# Altium PCB Mega2560_Custom.PcbDoc (part 5 of 6)
Units mil, origin at the board's own origin, x right, y up, seen from the top; angles counter-clockwise.
Board outline 4742.41 x 2889.95 mil, 2 copper layers (Top Layer, Bottom Layer), stack 57 mil thick; 213 components, 133 nets, 789 pads, 812 vias.
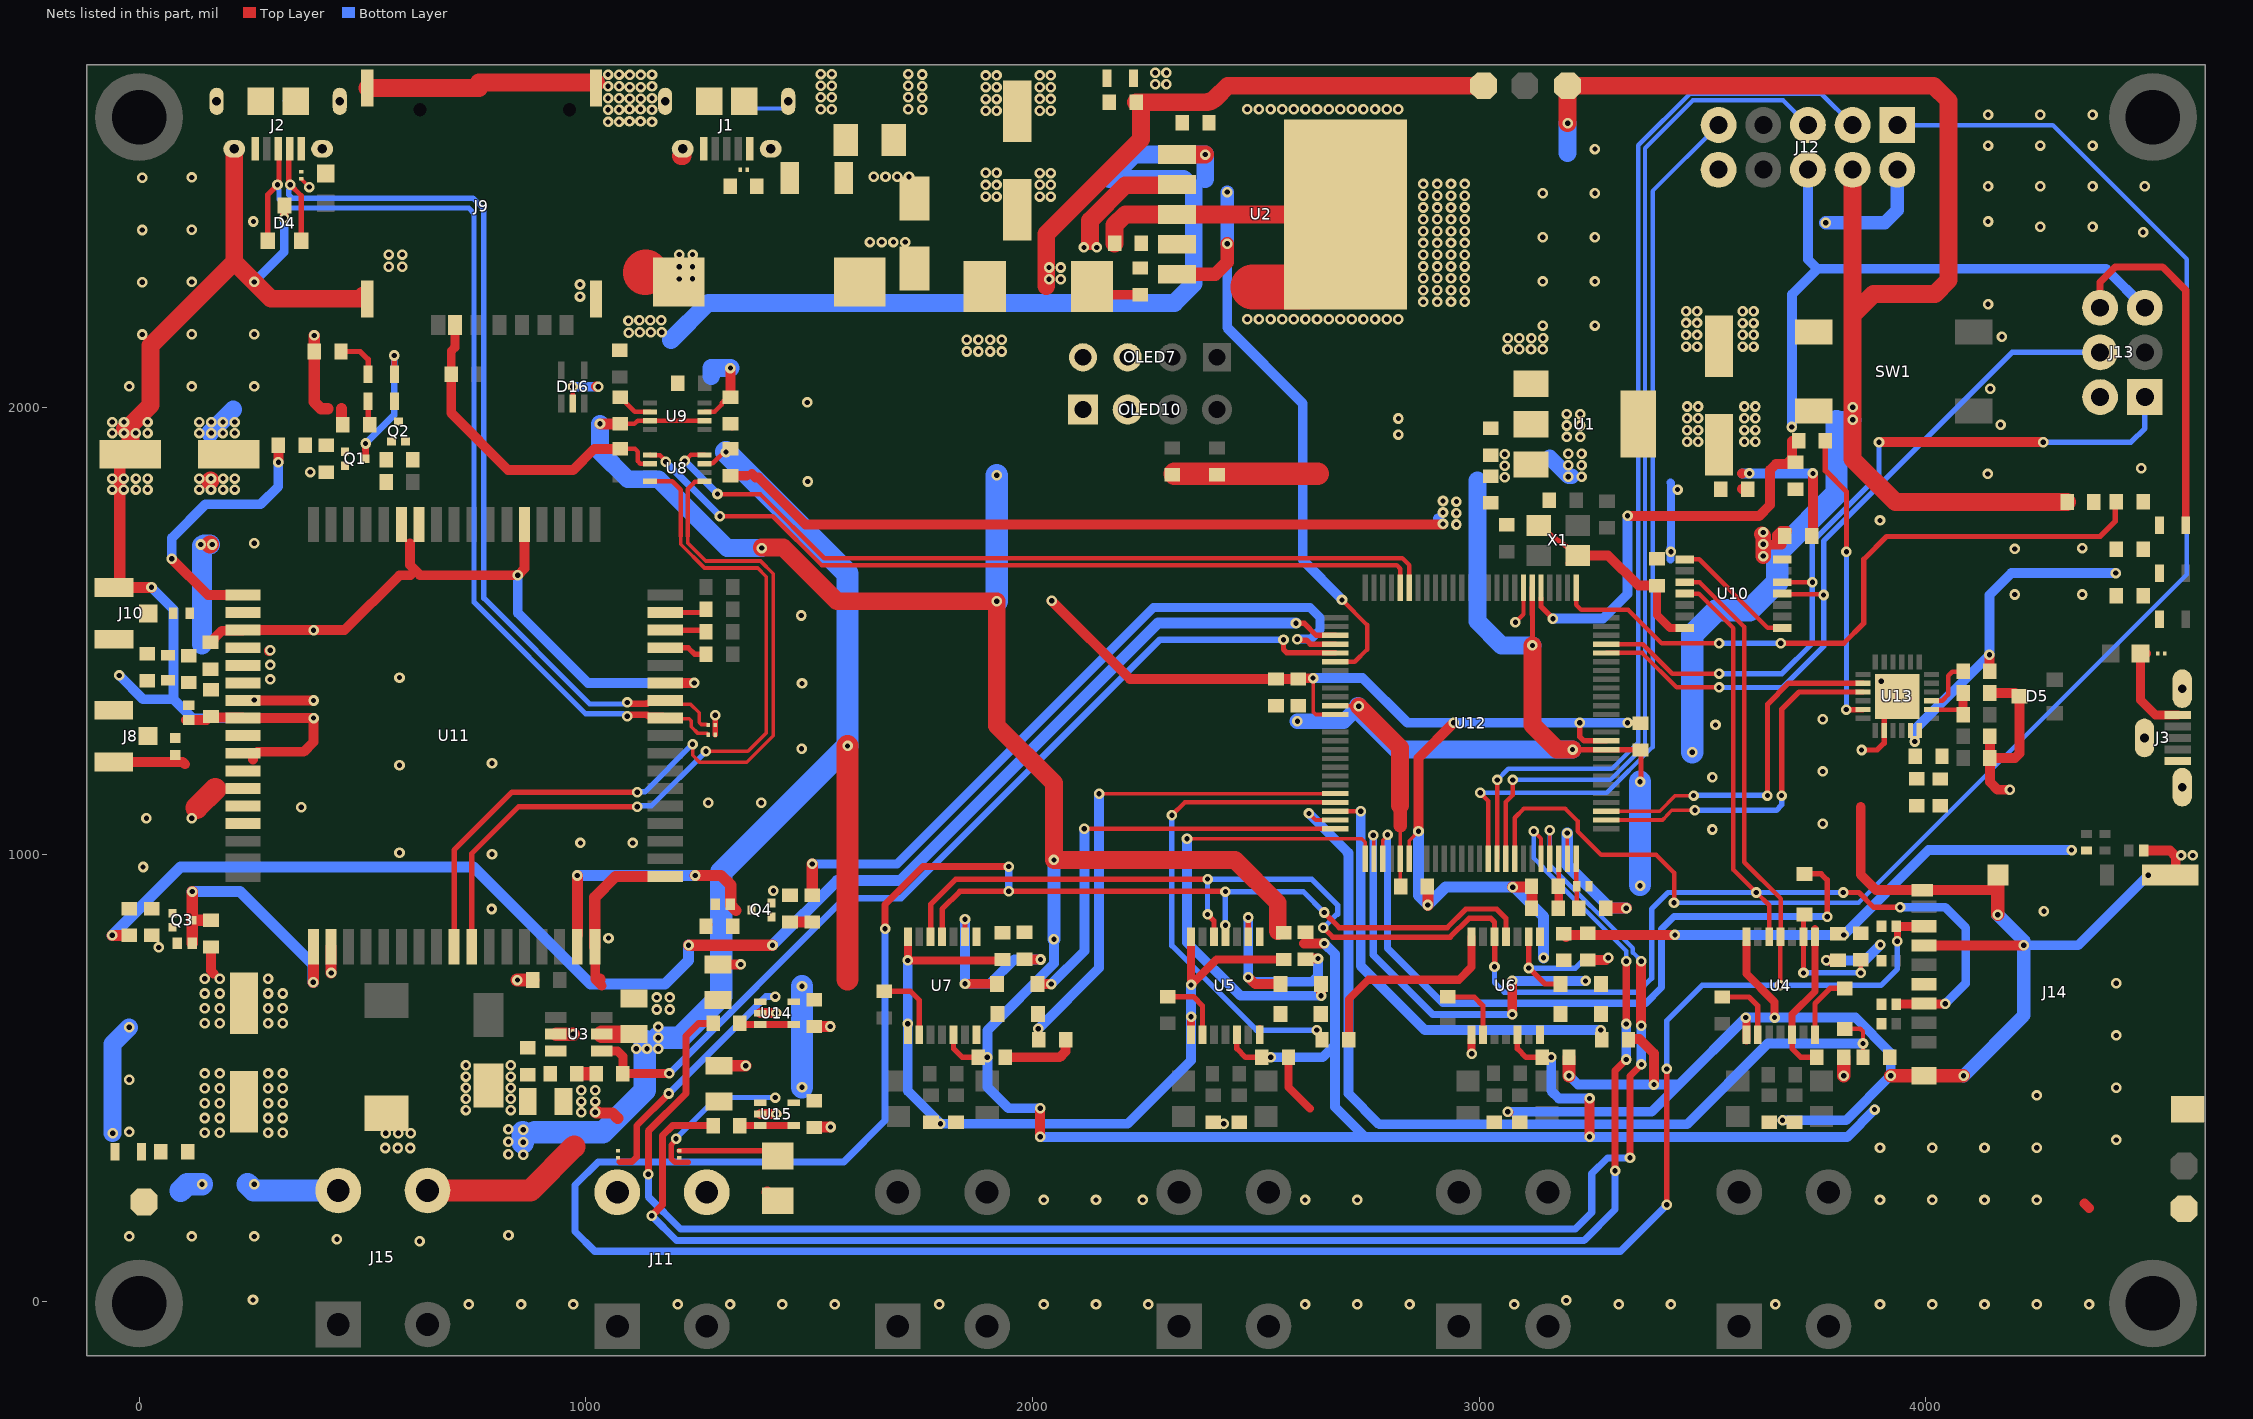
[diagram p2: the nets of this part, all layers, seen from the top]

## Via types
v1: diameter 23.62, hole 11.81, Top Layer to Bottom Layer, 812 vias

## Nets (pads, with @x,y where several pads share a name; then routed paths per layer and width w, separated by ;. In a path a pad name is that pad's centre, name@x,y a point inside that pad or via, vN(x,y) a via of type N, cw(c..) or ccw(c..) an arc to the next point about the centre after c; other vN are vias at no path point) (continued)
GSM_RX: (continued)
  Bottom Layer w12: v1(1115.45,1106.95) 1117.68,1109.17 1147.17,1109.17 v1(1269,1231)
GSM_TX: U8.5 U11.9 | length 1833.8
  Top Layer w8: 1228,1712 1228,1697.38 1268.38,1657 1391.08,1657 1419.61,1628.47 1419.61,1265.53 1360.47,1206.39 1254.61,1206.39 1239.11,1221.89 v1(1239.11,1246.98)
  Top Layer w10: 1228,1712 1228,1818.13 1244.39,1834.52 1264.94,1834.52 U8.5@1265.85,1835.42
  Top Layer w12: U11.9@705.26,793.55 705.26,1010.07 834.67,1139.48 v1(1115.45,1139.48)
  Bottom Layer w12: v1(1115.45,1139.48) 1116.11,1140.13 1132.27,1140.13 v1(1239.11,1246.98)
GSM_USB.GSM_USB_D_N: D4.2 D17.1 J2.2 U11.28 | length 2203.1
  Top Layer w8: U11.28@1177.7,1344.73 1185.91,1336.52 1234.48,1336.52 1254,1317 1254,1295.69 1258.69,1291 1270.16,1291 1270.43,1290.72 D17.1@1274.19,1290.72
  Top Layer w12: J2.2@337.04,2579.65 335.25,2577.85 335.25,2507 336.34,2505.91 336.34,2501.22 363,2474.56 D4.2@363,2374
  Top Layer w15: v1(1092.82,1340.35) 1094.47,1338.7 1100.57,1338.7 1101.73,1337.54 1137.05,1337.54 1139.53,1340.02 1173,1340.02 U11.28@1177.7,1344.73
  Bottom Layer w10: v1@1083.83,1337.04 1084.53,1337.75 1090.22,1337.75 v1(1092.82,1340.35)
  Bottom Layer w12: v1(338.56,2499) 336.34,2496.78 336.34,2488.56 335.25,2487.47 335.25,2476.19 342.28,2469.16 747.08,2469.16 771.88,2444.36 771.88,1574.01 1008.84,1337.04 v1@1083.83,1337.04
GSM_USB.GSM_USB_D_P: D4.1 D18.1 J2.3 U11.27 | length 2231.2
  Top Layer w8: U11.27@1177.7,1305.36 1179.38,1303.69 1231.31,1303.69 1236,1299 1236,1286.23 1251.23,1271 1271.46,1271 1273.46,1269 D18.1@1274.25,1269
  Top Layer w12: D4.1@288.2,2374 288.2,2477.26 312.16,2501.22 312.16,2505.91 313.25,2507 313.25,2577.85 J2.3@311.45,2579.65
  Top Layer w15: v1(1092.82,1309.73) 1094.47,1311.38 1100.57,1311.38 1101.73,1312.54 1137.05,1312.54 1139.53,1310.06 1173,1310.06 U11.27@1177.7,1305.36
  Bottom Layer w8: v1(1092.82,1309.73) v1@1095.81,1312.72
  Bottom Layer w10: v1@1083.83,1315.04 1089.14,1309.73 v1(1092.82,1309.73)
  Bottom Layer w12: v1(309.94,2499) 312.16,2496.78 312.16,2488.56 313.25,2487.47 313.25,2467.08 333.16,2447.16 737.97,2447.16 749.88,2435.25 749.88,1564.89 999.73,1315.04 v1@1083.83,1315.04
JTAG_TCK: J12.1 U12.93 | length 3527.7
  Top Layer w10: U12.93@3079.25,990.65 3079.25,1082.25 3100,1103 3192,1103 3220,1075 3220,1052 3273,999 3396,999 3436,959 v1(3436,892)
  Bottom Layer w10: v1(3436,892) 3849,892 4583.82,1626.82 4583.82,2332.95 4283.82,2632.95 J12.1@3935.82,2632.95
JTAG_TDI: J12.9 U12.90 | length 2038.4
  Top Layer w10: v1@3001,1139 v1(3002,1138) 3020.19,1119.81 U12.90@3020.19,990.65
  Bottom Layer w10: v1(3002,1138) 3285.5,1138 3388,1240.5 3388,2485.13 J12.9@3535.82,2632.95
JTAG_TDO: J12.3 U12.91 | length 2419.3
  Top Layer w10: U12.91@3039.88,990.65 3039.88,1165.88 v1@3040,1166
  Bottom Layer w10: v1(3040,1167) 3065,1192 3297.08,1192 3356,1250.92 3356,2587.34 3471.61,2702.95 3765.82,2702.95 J12.3@3835.82,2632.95
JTAG_TMS: J12.5 U12.92 | length 2279.2
  Top Layer w10: U12.92@3059.56,990.65 3059.56,1117.56 3075,1133 v1(3075,1167)
  Bottom Layer w10: v1(3075,1167) 3293.29,1167 3371,1244.71 3371,2581.13 3477.82,2687.95 3680.82,2687.95 J12.5@3735.82,2632.95
MCU_RX: U8.8 U12.45 | length 1817.4
  Top Layer w10: v1(1221.82,1881) 1235.3,1894.48 U8.8@1265.85,1894.48 ; v1(1294.82,1806.95) 1390.05,1806.95 1534,1663 2828,1663 2843.03,1647.97 U12.45@2843.03,1596.95
  Bottom Layer w16: v1(1221.82,1881) v1@1294.42,1808.41
MCU_TX: U8.1 U12.46 | length 1829.2
  Top Layer w10: U8.1@1143.8,1894.48 1144.31,1893.96 1166.15,1893.96 1178.82,1881.3 v1(1178.82,1878.95) ; v1(1300.32,1757.45) 1418.34,1757.45 1527.79,1648 2815,1648 2823.34,1639.66 U12.46@2823.34,1596.95
  Bottom Layer w16: v1(1178.82,1878.95) v1(1300.32,1757.45)
MISO: J13.1 U10.12 U12.22 | length 1773.9
  Top Layer w10: U12.22@3283.97,1470.96 3366.04,1470.96 3432.05,1404.95 v1(3536.82,1404.95) ; U10.12@3678.07,1609.54 v1(3745.82,1609.54)
  Top Layer w22: v1@3895.57,1923.26 v1@4262.82,1923.26
  Bottom Layer w12: v1(3536.82,1404.95) 3677.82,1404.95 3745.82,1472.95 3745.82,1700.86 3894.82,1849.86 v1(3894.82,1922.95) ; v1(4262.82,1922.95) 4458.77,1922.95 4489.82,1954 J13.1@4489.82,2023.95
MISO_3.3V: D28.1 J14.7 U4.11 U5.11 U6.11 U7.11 U10.3 | length 7956.8
  Top Layer w10: U10.3@3459.57,1609.54 3493.23,1609.54 3593.41,1509.36 3593.41,982.59 3674.68,901.32 U4.11@3674.68,815.41 3673.84,814.57 3673.84,707.84 v1(3673,707)
  Top Layer w12: U7.11@1797.64,802.41 U7.11@1797.64,815.41 1797.64,877.96 1837.22,917.54 v1@2431.82,917.54 ; U5.11@2431.82,802.41 U5.11@2431.82,815.41 v1(2431.82,841.95) ; v1(2652.87,870.13) 2687,836 2928,836 2970,878 3039,878 3060,857 U6.11@3060,802 ; U6.11@3059.68,802.41 U6.11@3059.68,815.41 ; v1(3420,216) v1(3420,520)
  Top Layer w16: v1@1670,832 v1(1670,833.51) 1670,887.95 1755,972.95 v1(1946.82,972.95) ; D28.1@3935.03,839.29 3934.73,839 3936,837.73 v1(3936,806) ; J14.7@3995.22,839.29 J14.7@3995.52,839.59
  Top Layer w20: D28.1@3935.03,839.29 J14.7@3995.22,839.29
  Bottom Layer w12: v1(2431.82,841.95) v1(2431.82,916.95) 2606.05,916.95 v1(2652.87,870.13) ; v1(3420,520) 3420,628 3499,707 v1(3673,707) 3899.23,707 3936,743.77 v1(3936,806)
  Bottom Layer w16: v1(1670,833.51) 1670,404.3 1577.65,311.95 1027.82,311.95 975.82,259.95 975.82,156.18 1020.05,111.95 3315.95,111.95 v1(3420,216) ; v1(1946.82,917.95) v1(1946.82,972.95)
MOSI: J13.4 U10.11 U12.21 | length 1682.7
  Top Layer w10: U12.21@3283.97,1451.28 3364.51,1451.28 3441.84,1373.95 v1(3536.82,1373.95) ; U10.11@3678.07,1583.95 3679.57,1582.45 3771.32,1582.45 v1@3772.82,1580.95
  Bottom Layer w12: v1(3536.82,1373.95) 3678.82,1373.95 3770.82,1465.95 v1(3770.82,1580.95) 3770.82,1701.82 4192.95,2123.95 J13.4@4389.82,2123.95
MOSI_3.3V: D26.1 J14.3 U4.12 U5.12 U6.12 U7.12 U10.4 | length 4262.3
  Top Layer w10: U10.4@3459.57,1583.95 3491.82,1583.95 3569,1506.77 3569,966 v1(3620,915) 3620.77,915 3649.09,886.68 U4.12@3649.09,815.41 U4.12@3649.09,802.41
  Top Layer w12: U7.12@1772.05,802.41 U7.12@1772.05,815.41 1772.05,888.56 1828.44,944.95 v1(2391.82,944.95) ; v1(2391.82,865.95) 2406.23,851.54 U5.12@2406.23,815.41 U5.12@2406.23,802.41 ; v1(2651,836) 2672,815 2935,815 2977,857 3026,857 3034.09,848.91 U6.12@3034.09,815.41 ; v1@3034.44,748.89 U6.12@3034.44,815.41 ; v1(3815,915) 3850,915 3883,882 v1@3935,882 ; D26.1@3934.73,665 D26.1@3935.41,665.68 ; J14.3@3991.66,665.68 J14.3@3993.92,667.95
  Top Layer w20: D26.1@3935.41,665.68 3991.66,665.68 v1@4042.96,665.68
  Top Layer w22: J14.3@3993.92,667.95 J14.3@3995.52,666.36
  Bottom Layer w12: v1(2391.82,865.95) v1(2391.82,944.95) 2624.82,944.95 2683,886.77 2683,868 ; v1(2651,836) 2683,868 ; 2683,866 2683,868 ; v1@3034.09,749 v1(3034.09,748.54) 3034.09,713.91 3056,692 3355,692 3386,723 3386,878 3423,915 v1(3620,915) v1(3815,915)
  Bottom Layer w20: v1(3942,882) 4043,882 4089,836 4089,711.69 v1(4042.97,665.67)
NetC39_1: C39.1 U11.53
NetC55_2: C55.2 D1.2 F1.1 J1.1
NetD2_2: D2.2 F2.1 J2.1
NetD3_2: D3.2 F3.1 J3.1 | length 221.3
  Top Layer w20: F3.1@4477,1447 F3.1@4488,1447 ; F3.1@4484,1440 F3.1@4494,1450 ; F3.1@4484,1440.26 4480,1440.26 4480,1346 4513.87,1312.13 J3.1@4563.82,1312.13
NetD7_1: D7.1 L2.1 U2.2 | length 292
  Top Layer w40: 2129,2372.95 2129,2419.36 2207.64,2498 U2.2@2342,2498
  other v1: 2115,2358.95 2143.82,2358.95 1636,2371 1662.33,2371 1688.67,2371 1715,2371
NetD8_2: D8.2 R8.1 U4.9 | length 288.1
  Top Layer w10: v1(3854,735) R8.1@3854,764
  Top Layer w12: v1(3725.87,735) U4.9@3725.87,815.41 D8.2@3725.87,866
  Bottom Layer w12: v1(3725.87,735) v1(3854,735)
NetD9_2: D9.2 R9.1 U5.9 | length 489.8
  Top Layer w12: U5.9@2483,815.41 v1(2483,859)
  Top Layer w22: v1(2483,725) 2483.44,725 2498.44,710 D9.2@2555.45,710 ; R9.1@2611,765.95 2612.05,767 v1(2639,767)
  Bottom Layer w22: v1@2482.25,725 2483.44,725 2493.44,715 2625.8,715 2638.69,727.89 2638.69,766.69 v1(2639,767) ; v1(2483,725) v1(2483,859)
NetD10_2: D10.2 U4.7 | length 150.1
  Top Layer w12: U4.7@3751.46,596.91 3751.46,666.46 3785.28,700.28 D10.2@3818,700.28
NetD11_2: D11.2 U5.7 | length 28.1
  Top Layer w12: U5.7@2508.59,583.91 U5.7@2508.59,596.91 U5.7@2508.59,612
NetD12_2: D12.2 R14.1 U6.9 | length 378.3
  Top Layer w12: U6.9@3110.87,802.41 3110.93,802.34 3110.93,746 3146.93,710 D12.2@3181.72,710
  Top Layer w22: R14.1@3243,763.95 3283.51,763.95 3288.25,768.69 3288.63,768.69 v1@3289.07,768.25
  Bottom Layer w12: v1(3111,746) 3111.5,745.5 3215.5,745.5 3239,769 v1(3289,769)
NetD13_2: D13.2 R15.1 U7.9 | length 495.3
  Top Layer w12: U7.9@1848.82,802.41 U7.9@1848.82,815.41 v1(1848.82,854.95)
  Top Layer w22: v1(1848.82,710.82) 1849.13,710.51 1919.94,710.51 D13.2@1920.45,710 ; R15.1@1982,765.95 1982.95,765 v1(2018,765)
  Bottom Layer w22: v1(1848.82,710.82) 1904.82,710.82 1959,765 v1(2018,765) ; v1@1848.82,712.18 v1(1848.82,854.95)
NetD14_2: D14.2 U6.7 | length 21.1
  Top Layer w12: U6.7@3136.46,583.91 U6.7@3136.46,596.91 U6.7@3136.46,605
NetD15_2: D15.2 U7.7
NetF1_2: F1.2 FB1.1
NetJ13_2: J13.2 SB1.1
NetL3_1: L3.1 R20.1 | length 2.5
  Top Layer w22: R20.1@105,1445 R20.1@107.5,1445
NetL3_2: L3.2 SB8.1
NetLED1_1: LED1.1 R6.1
NetLED2_1: LED2.1 R7.1
NetLED3_1: LED3.1 R25.1 | length 101.4
  Top Layer w12: R25.1@452,2126 495,2126 512.77,2108.23 LED3.1@512.77,2074.95
NetLED3_2: LED3.2 Q1.3 | length 299.7
  Top Layer w10: v1(571,2117) v1@571.41,2116.59 ; LED3.2@571.41,2075.36 LED3.2@571.82,2074.95
  Top Layer w12: LED3.2@571.41,2075.36 v1@571.41,2116.59
  Top Layer w15: Q1.3@506.82,1886 v1@506.82,1919.82
  Bottom Layer w15: v1(507,1920) 571,1984 v1(571,2117)
NetLED4_1: LED4.1 R26.1 | length 55.9
  Top Layer w12: R26.1@512.77,1959 LED4.1@512.77,2014.95
NetLED4_2: LED4.2 Q2.3 | length 4.1
  Top Layer w10: LED4.2@567.82,2014.95 LED4.2@568.82,2013.95 ; LED4.2@571.82,2014.95 LED4.2@573.74,2013.04
NetLED6_1: LED6.1 R41.1
NetLED8_1: LED8.1 R45.1
NetLED9_1: LED9.1 R46.1
NETLIGHT: R27.2 U11.52 | length 618.4
  Top Layer w22: v1(73,1662) 154.05,1580.95 U11.52@232.82,1580.95 ; v1(312,1878) R27.2@312,1916
  Bottom Layer w22: v1(73,1662) 73.31,1662.31 73.31,1708.31 149,1784 272,1784 311.69,1823.69 311.69,1877.69 v1(312,1878)
NetQ1_1: Q1.1 R27.1 R28.1
NetQ2_1: Q2.1 R29.1 R30.1
NetQ3_1: Q3.1 R31.1 R32.1
NetQ4_1: Q4.1 R33.1 R34.1 | length 50
  Top Layer w25: R34.1@1457,849 R33.1@1507,849
NetR10_2: R10.2 U4.2 | length 164.2
  Top Layer w12: R10.2@3544.87,680.95 3603.87,680.95 3623.5,661.31 U4.2@3623.5,583.91
NetR11_2: R11.2 U5.2 | length 163.8
  Top Layer w12: R11.2@2302.82,681.95 2360,681.95 2380.64,661.31 U5.2@2380.64,583.91
NetR16_2: R16.2 U6.2 | length 164.2
  Top Layer w12: R16.2@2929.87,680.95 2988.87,680.95 3008.5,661.31 U6.2@3008.5,583.91
NetR17_2: R17.2 U7.2 | length 164.2
  Top Layer w12: R17.2@1667.82,693.95 1726.82,693.95 1746.46,674.31 U7.2@1746.46,596.91
NetR21_2: R21.2 U11.33 | length 94.4
  Top Layer w10: R21.2@1262.14,1541.58 R21.2@1269.18,1548.62
  Top Layer w12: U11.33@1177.7,1541.58 R21.2@1262.14,1541.58
NetR22_2: R22.2 U11.32 | length 93.1
  Top Layer w10: R22.2@1265.25,1502.21 R22.2@1269.18,1498.28
  Top Layer w12: U11.32@1177.7,1502.21 R22.2@1265.25,1502.21
NetR23_2: R23.2 U11.31 | length 97.6
  Top Layer w12: U11.31@1177.7,1462.84 1229.16,1462.84 1244.05,1447.95 R23.2@1269.18,1447.95
NetR42_1: R42.1 R43.1 U13.8 | length 118.9
  Top Layer w10: U13.8@4012.59,1324.42 4083,1324.42 R42.1@4083,1313
  Top Layer w20: R42.1@4083,1324.42 R43.1@4083,1361.5
NetR44_2: R44.2 U13.9 | length 122.3
  Top Layer w10: U13.9@4012.59,1344.11 4012.76,1344.28 4036.28,1344.28 4050,1358 4050,1400 4058.86,1408.86 4081.86,1408.86 R44.2@4083,1410
NRESET: C40.2 D19.2 Q4.3 U11.16 | length 546.1
  Top Layer w25: U11.16@981.15,820.42 v1@981.15,953 ; v1(1245,953) 1303,953 1324.5,931.5 1324.5,886.5 1336,875
  Bottom Layer w25: v1@981.15,953 v1(1245,953)
  other v1: 981,953
PB7: R41.2 U12.26 | length 1514.4
  Top Layer w10: U12.26@3217.04,1596.95 3217.04,1558.73 3227.82,1547.95 3333.05,1547.95 3408.05,1472.95 v1(3536.82,1472.95)
  Top Layer w12: v1(3674.82,1472.95) 3815.95,1472.95 3861,1518 3861,1661 3911.95,1711.95 4389.95,1711.95 4423.48,1745.48 4423.48,1779.48 R41.2@4426,1782
  Bottom Layer w12: v1(3536.82,1472.95) v1(3674.82,1472.95)
PRGM_DTR: C44.1 U13.23 | length 661.6
  Top Layer w12: C44.1@3774.82,1925.95 3774.82,1859.18 3822,1812 v1(3822,1678) ; v1@3818.29,1324.42 v1(3821.82,1324.42) U13.23@3859.05,1324.42
  Bottom Layer w12: v1@3822,1324.6 v1(3822,1678)
PRGM_RX: U12.3 U13.20 | length 813.8
  Top Layer w8: U12.3@3283.97,1096.95 3403.95,1096.95 3438.95,1131.95 v1(3479.82,1131.95)
  Top Layer w12: v1(3645.14,1131.95) 3645.14,1336.14 3692.48,1383.48 U13.20@3859.05,1383.48
  Bottom Layer w12: v1@3479.82,1132.95 3480.32,1132.45 3644.64,1132.45 v1(3645.14,1131.95)
PRGM_TX: U12.2 U13.21 | length 819.4
  Top Layer w8: U12.2@3283.97,1077.26 3410.26,1077.26 3420,1087 ; 3419.5,1087.5 3430.95,1098.95 v1(3482.82,1098.95)
  Top Layer w12: v1(3676.82,1131.95) 3676.82,1324.82 3715.79,1363.79 U13.21@3859.05,1363.79
  Bottom Layer w12: v1(3482.82,1098.95) 3664.95,1098.95 3676.82,1110.82 v1(3676.82,1131.95)
PWR12V_EN: R3.2 U3.4 U12.55 | length 2115.7
  Top Layer w12: v1(2561.82,1480.95) 2561.82,1458.95 2569.49,1451.28 U12.55@2677.67,1451.28
  Top Layer w15: R3.2@1083,509 R3.2@1085,507
  Top Layer w20: U3.4@1035.57,560.6 1035.73,560.44 1070.56,560.44 1083,548 R3.2@1083,509 ; R3.2@1085,507 1088,510 v1(1187,510)
  Bottom Layer w15: v1(1187,510) 1579,902 1706,902 2284.95,1480.95 v1(2561.82,1480.95)
PWRKEY: C41.2 D20.2 Q3.3 U11.1 | length 615.6
  Top Layer w25: D20.2@119.18,800.95 Q3.3@119.18,853.59 ; v1(119.18,917) 119.18,916.95 Q3.3@119.18,853.59 ; C41.2@161,853 160.95,852.95 Q3.3@119.82,852.95 Q3.3@119.18,853.59 ; v1(390,714) 390.3,714.3 U11.1@390.3,793.55
  Bottom Layer w25: v1(119.18,917) 226,917 390,753 v1(390,714)
PWRKEY_EN: R31.2 U12.53 | length 3314
  Top Layer w12: v1(2589.82,1517.95) 2589.9,1517.87 2607.9,1517.87 2635.12,1490.65 U12.53@2677.67,1490.65
  Top Layer w25: v1(-60,819) R31.2@-21.87,819 ; v1(1230,797) v1(1418,797)
  Bottom Layer w25: v1(-60,819) 93,972 749,972 1011,710 1177,710 1230,763 v1@1230,797.38 ; v1(1418,797) 1563,942 1705,942 2280.95,1517.95 v1(2589.82,1517.95)
R\E\S\E\T\: C44.2 J12.6 J13.5 R38.1 SW1.3 U12.30 | length 2306.1
  Top Layer w8: U12.30@3138.06,1596.71 U12.30@3138.3,1596.95
  Top Layer w12: U12.30@3138.3,1573.42 3138.3,1554.7 v1(3165,1528)
  Top Layer w22: v1(3332,1758) 3626.87,1758 3651,1782.13 3651,1861.11 3663.89,1874 3688,1874 3699.82,1885.82 C44.2@3699.82,1925.95
  Bottom Layer w22: v1(3165,1528) 3277,1528 3332,1583 v1(3332,1758) ; v1@3699.82,1957 3699.82,2253.95 3756.93,2311.06 ; J12.6@3735.82,2532.95 3735.82,2332.16 3756.93,2311.06 ; J13.5@4489.82,2223.95 4402.71,2311.06 3756.93,2311.06
  other v1: 3699.82,1956.95
RF_ANT: D22.1 J8.1 U11.60